# Altium PCB 24V-70A-Power-Board-v2.0.PcbDoc (part 7 of 9)
Units mm, origin at the board's own origin, x right, y up, seen from the top; angles counter-clockwise.
Board outline 350 x 215 mm, 2 copper layers (Top Layer, Bottom Layer), stack 1.64 mm thick; 337 components, 182 nets, 856 pads, 561 vias.
Unrouted connection lines stored in the file: 58.
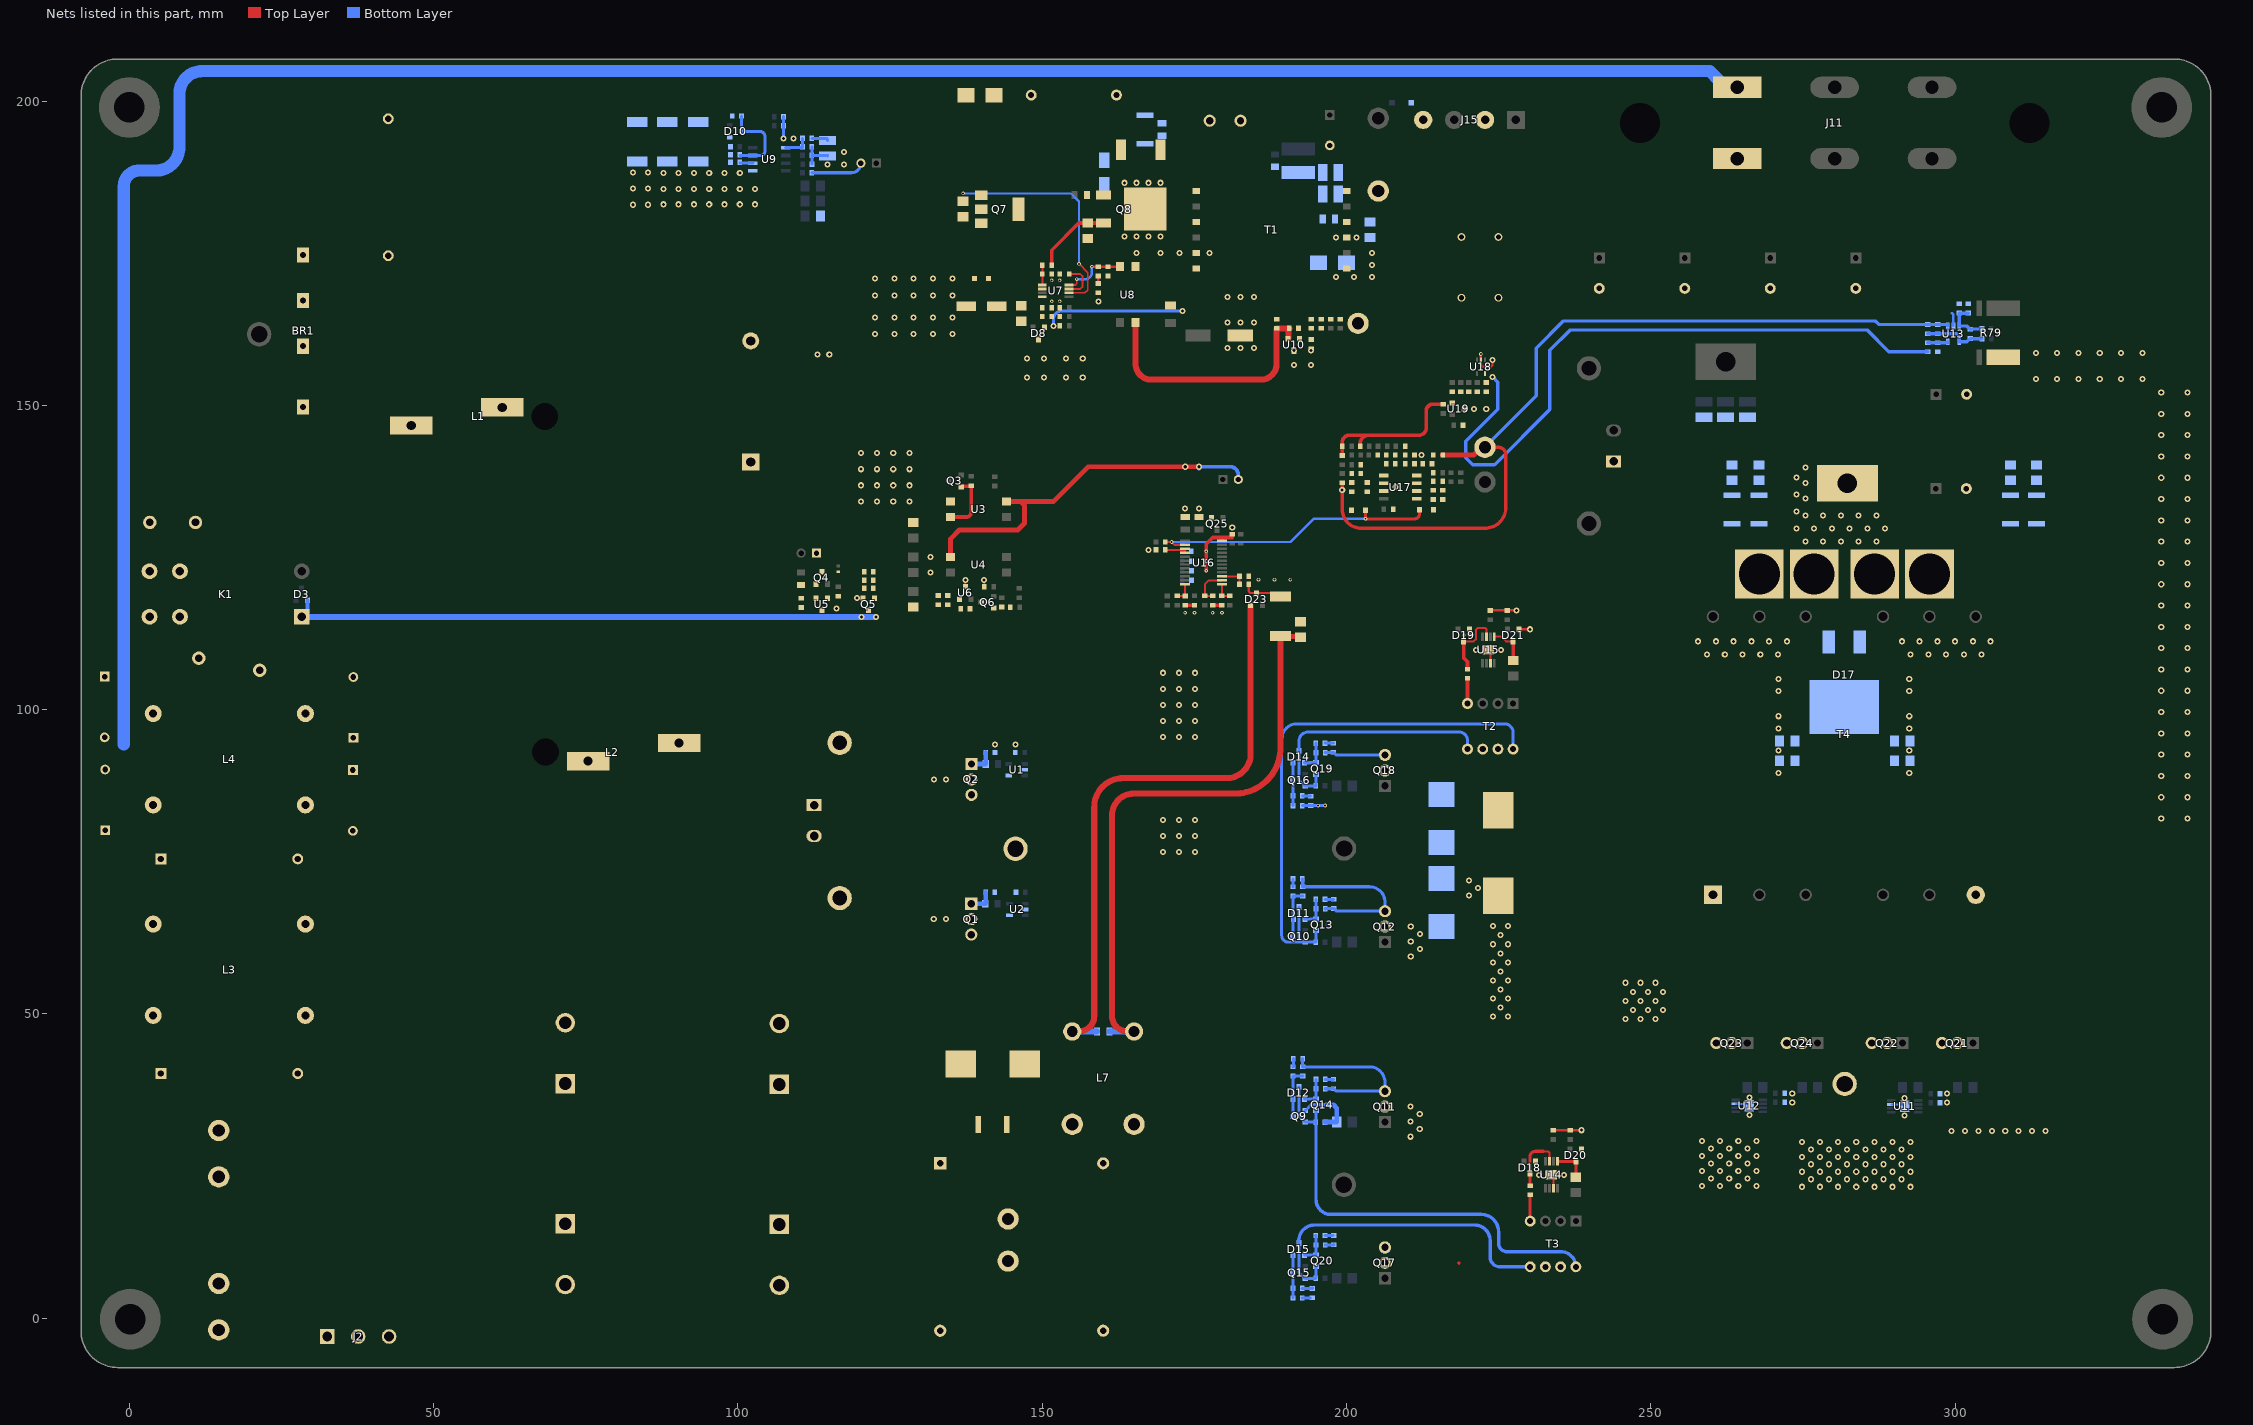
[diagram p2: the nets of this part, all layers, seen from the top]

## Via types
v1: diameter 1, hole 0.5, Top Layer to Bottom Layer, 506 vias
v2: diameter 0.6, hole 0.3, Top Layer to Bottom Layer, 35 vias
v3: diameter 1, hole 0.5, Top Layer to Bottom Layer, tented both sides, 16 vias
v4: diameter 0.6, hole 0.3, Top Layer to Bottom Layer, tented both sides, 4 vias

## Nets (pads, with @x,y where several pads share a name; then routed paths per layer and width w, separated by ;. In a path a pad name is that pad's centre, name@x,y a point inside that pad or via, vN(x,y) a via of type N, cw(c..) or ccw(c..) an arc to the next point about the centre after c; other vN are vias at no path point) (continued)
NetC32_2: (continued)
  Top Layer w0.3: U7.3@154.423,169.154 156.263,169.154 156.647,169.538 156.647,171.217 156.262,171.603 C32.2@154.423,171.603
NetC33_2: C33.2 R45.2 U7.4 U8.4 | length 10.8
  Top Layer w0.3: U7.4@154.423,169.804 155.464,169.804 155.689,170.029 v2(155.689,170.755)
  Top Layer w0.4: v2(158.166,172.803) R45.2@159.233,172.803 C33.2@160.807,172.803 U8.4@162.794,172.803
  Bottom Layer w0.4: v2(155.689,170.755) 157.056,170.755 ccw(c157.056,171.865) 158.166,171.865 v2(158.166,172.803)
NetC36_2: C36.2 R45.1 | length 1.2
  Top Layer w0.4: C36.2@159.233,170.029 R45.1@159.233,171.279
NetC37_2: C37.2 C38.1
NetC39_2: C39.2 L6.2 L7.2 R49.2
NetC40_1: C40.1 R50.2 | length 1.3
  Bottom Layer w0.5: C40.1@191.211,72.212 191.218,72.212 R50.2@191.218,70.907
NetC40_2: C40.2 C42.2 C44.2 C46.2 L8.1 Q12.3 Q18.2 T2.7 | length 27.7
  Bottom Layer w0.508: C40.2@192.735,72.212 cw(c192.735,72.13) 192.817,72.13 C42.2@192.817,70.907 203.791,70.907 cw(c203.791,68.367) 206.331,68.367 Q12.3@206.331,66.899 198.392,66.899 198.094,67.197 198.094,67.199 197.967,67.326 C46.2@197.904,67.326 ; C44.2@196.507,67.288 196.524,67.306 197.813,67.306 C46.2@197.831,67.323
NetC41_1: C41.1 R51.2 | length 1.4
  Bottom Layer w0.5: R51.2@191.218,41.324 ccw(c191.218,41.369) 191.262,41.369 C41.1@191.262,42.672
NetC41_2: C41.2 C43.2 C45.2 C47.2 Q11.3 Q17.2 T3.7 T4.6 | length 27.8
  Top Layer w0.508: 218.414,9.108 cw(c218.414,9.032) 218.491,9.032
  Bottom Layer w0.5: C43.2@192.811,41.369 C41.2@192.811,42.672 ; C43.2@192.817,41.324 203.778,41.324 cw(c203.778,38.784) 206.318,38.784 Q11.3@206.318,37.317 198.338,37.317 197.951,37.704 C47.2@197.951,37.729 ; C45.2@196.506,37.705 196.517,37.716 197.854,37.716 C47.2@197.865,37.727
NetC42_1: C42.1 D11.2 Q10.3 R50.1 | length 8.2
  Bottom Layer w0.5: Q10.3@191.218,62.769 R50.1@191.218,69.383 C42.1@192.817,69.383
NetC43_1: C43.1 D12.2 Q9.3 R51.1 | length 8.2
  Bottom Layer w0.5: Q9.3@191.218,33.187 R51.1@191.218,39.8 ; R51.1@191.218,39.8 C43.1@192.817,39.8
NetC44_1: C44.1 D11.1 Q13.2 R57.1 | length 5.1
  Bottom Layer w0.5: D11.1@193.123,65.619 Q13.2@194.996,65.619 194.977,65.639 194.977,68.83 R57.1@194.957,68.85
NetC45_1: C45.1 D12.1 Q14.2 R58.1 | length 5.1
  Bottom Layer w0.5: D12.1@193.109,36.037 Q14.2@194.982,36.037 ; R58.1@194.982,39.265 194.989,39.258 194.989,36.044 Q14.2@194.996,36.037
NetC46_1: C46.1 R57.2 | length 1.4
  Bottom Layer w0.5: R57.2@196.481,68.85 R57.2@196.481,68.85 197.83,68.849 C46.1@197.831,68.847
NetC47_1: C47.1 R58.2 | length 1.4
  Bottom Layer w0.5: R58.2@196.506,39.265 196.513,39.258 197.858,39.258 C47.1@197.865,39.251
NetC48_2: C48.2 T2.4 | length 4.1
  Top Layer w0.6: T2.4@219.892,101.023 C48.2@219.892,105.156
NetC49_2: C49.2 T3.4 | length 4.3
  Top Layer w0.508: T3.4@230.189,15.958 C49.2@230.189,20.269
NetC50_1: C50.1 R60.2 | length 1.4
  Bottom Layer w0.5: R60.2@192.742,85.845 C50.1@194.107,85.845
NetC51_1: C51.1 R61.2 | length 1.4
  Bottom Layer w0.5: R61.2@192.728,4.924 C51.1@194.093,4.924
  Bottom Layer w0.559: C51.1@194.371,4.924 cw(c194.371,4.887) C51.1@194.409,4.887
NetC52_1: C52.1 D14.2 Q16.3 R60.1 | length 7
  Bottom Layer w0.5: C52.1@191.218,84.245 R60.1@191.218,85.845 D14.2@191.218,91.283
NetC53_1: C53.1 D15.2 Q15.3 R61.1 | length 7
  Bottom Layer w0.5: R61.1@191.204,4.924 D15.2@191.204,10.363 ; C53.1@191.204,3.325 R61.1@191.204,4.924
NetC54_1: C54.1 D14.1 Q19.2 R66.1 | length 5.1
  Bottom Layer w0.5: D14.1@193.123,91.288 Q19.2@194.996,91.288 194.977,91.308 194.977,94.499 R66.1@194.957,94.519
NetC55_1: C55.1 D15.1 Q20.2 R67.1 | length 5.1
  Bottom Layer w0.5: D15.1@193.109,10.368 194.982,10.368 194.963,10.387 194.963,13.579 C55.1@194.944,13.598
NetC56_1: C56.1 R66.2 | length 1.4
  Bottom Layer w0.5: R66.2@196.481,94.519 R66.2@196.481,94.519 197.83,94.517 C56.1@197.831,94.516
NetC57_1: C57.1 R67.2 | length 1.4
  Bottom Layer w0.508: R67.2@196.493,12.036 196.511,12.054 197.799,12.054 C57.1@197.817,12.072 ; C57.1@197.866,12.036 ccw(c197.866,12.074) C57.1@197.904,12.074
NetC71_2: C71.2 R69.1
NetC72_2: C72.2 R70.1
NetC73_2: C73.2 C74.2 C75.2 C76.2 D17.3 R68.1
  other v1: 271.018,103.048 292.482,103.048 271.018,105.08 292.482,105.08
NetC77_2: C77.2 R71.1
NetC78_2: C78.2 R72.1
NetC79_2: C79.2 C84.2 R77.1 R78.2 U13.3 | length 7.6
  Bottom Layer w0.559: C79.2@302.17,165.182 R77.1@300.707,165.182 300.699,165.174 300.699,163.06 U13.3@300.692,163.052 301.934,163.052 302.472,162.514 C84.2@302.536,162.514 302.586,162.565 304.39,162.565 R78.2@304.441,162.616
NetC84_1: C84.1 C86.2 R80.2 R82.1 U13.4 | length 10.2
  Bottom Layer w0.559: R82.1@295.504,161.782 C86.2@297.148,161.782 300.074,161.782 cw(c300.074,161.157) 300.699,161.157 300.699,160.723 U13.4@300.692,160.452 301.934,160.452 302.472,160.99 C84.1@302.536,160.99 R80.2@304.441,160.99
NetC85_1: C85.1 R81.2 U13.5 | length 3.4
  Bottom Layer w0.559: R81.2@295.504,160.325 298.771,160.325 298.792,160.346 U13.5@298.792,160.452
NetC87_1: C87.1 C90.2 D22.1 U17.1
NetC87_2: C87.2 R84.2 R85.1 R90.1 R96.2 U17.2
NetC90_1: C90.1 R84.1
NetC93_2: C93.2 U16.3 U16.4 | length 4
  Top Layer w0.35: C93.2@170.214,126.263 173.366,126.263 173.491,126.138 ; U16.4@173.491,125.813 173.491,126.138 ; U16.3@173.491,126.463 173.491,126.263 173.491,126.138
NetC94_2: C94.2 R101.1 U16.15 | length 4.2
  Top Layer w0.35: U16.15@179.536,121.913 C94.2@182.419,121.913 R101.1@182.419,120.613
NetC95_2: C95.2 R108.1 R109.2 U17.3
NetC96_1: C96.1 C97.1 D24.1 U17.7
NetC96_2: C96.2 R110.2 R111.1 U17.6
NetC97_2: C97.2 R110.1
NetC102_2: C102.2 R117.1 R120.2 U17.5
NetC103_2: C103.2 R42.1 U7.5 | length 3.2
  Top Layer w0.34: U7.5@150.023,169.804 150.025,169.806 R42.1@150.025,173.038
NetD2_2: D2.2 L2.1 Q1.2 Q2.2
  other v1: 132.182,65.586 134.188,65.586 132.207,88.548 134.214,88.548
NetD3_1: D3.1 K1.1 Q5.3 | length 97.7
  Bottom Layer w0.6: K1.1@28.325,115.221 ccw(c28.325,116.171) 28.609,115.264 ccw(c28.325,116.171) K1.1@29.275,116.171
  Bottom Layer w0.7: K1.1@29.275,116.171 D3.1@29.275,117.967
  Bottom Layer w1: K1.1@28.312,115.264 28.609,115.264 v1(120.286,115.264) v1(122.704,115.264)
NetD4_2: D4.2 R22.2
NetD5_1: D5.1 R25.1 T1.1 T1.3
  other v1: 198.258,171.094 201.232,171.094 204.205,171.094 204.205,173.078 204.205,175.062 198.258,177.602 201.625,177.602
NetD6_2: D6.2 Q8.2 T1.9
  other v1: 163.509,177.786 165.481,177.786 167.453,177.786 169.426,177.786 163.509,186.588 165.481,186.588 167.453,186.588 169.426,186.588
NetD7_2: D7.2 D8.1 R33.2 T1.12 | length 23.1
  Bottom Layer w0.5: v1(151.875,163.061) 151.875,164.227 cw(c153.155,164.227) 153.155,165.506 v1(173.076,165.506)
NetD11_3: D11.3 Q10.2 Q13.1 R52.1 T2.8 | length 89.5
  Bottom Layer w0.5: D11.3@192.209,67.583 192.209,62.368 ccw(c192.758,62.368) 192.758,61.819 ; Q13.1@194.996,63.719 194.977,63.7 194.977,61.839 R52.1@194.957,61.819 192.758,61.819 ; T2.8@227.392,93.523 227.392,96.23 ccw(c225.933,96.23) 225.933,97.688 191.897,97.688 ccw(c191.897,95.148) 189.357,95.148 189.357,62.89 ccw(c190.428,62.89) 190.428,61.819 192.758,61.819
NetD12_3: D12.3 Q9.2 Q14.1 R55.1 T3.8 | length 72.5
  Bottom Layer w0.33: Q14.1@194.957,34.098 cw(c194.996,34.098) Q14.1@194.996,34.137
  Bottom Layer w0.5: D12.3@192.159,38.037 192.195,38.001 192.195,33.196 193.154,32.237 Q9.2@193.218,32.237 194.944,32.237 R55.1@194.963,32.256
  Bottom Layer w0.559: Q14.1@194.996,34.137 194.996,19.532 ccw(c197.459,19.532) 197.459,17.069 222.144,17.069 cw(c222.144,14.219) 224.993,14.219 224.993,12.344 ccw(c226.39,12.344) 226.39,10.947 235.2,10.947 cw(c235.2,8.458) T3.8@237.689,8.458
NetD13_1: D13.1 L7.3 Q11.2 Q12.2
  other v1: 210.553,29.834 212.039,31.07 210.553,32.306 212.039,33.541 210.553,34.777 210.566,59.417 212.053,60.653 210.566,61.888 212.053,63.124 210.566,64.359
NetD13_2: D13.2 D16.1 L8.2 T4.1
  other v1: 245.856,49.186 248.327,49.186 250.798,49.186 224.052,49.567 226.523,49.567 247.091,50.673 249.562,50.673 252.034,50.673 225.287,51.054 245.856,52.16 248.327,52.16 250.798,52.16 224.052,52.541 226.523,52.541 247.091,53.646 249.562,53.646 252.034,53.646 225.287,54.027 245.856,55.133 248.327,55.133 250.798,55.133 224.052,55.514 226.523,55.514 225.287,57.001 224.052,58.487 226.523,58.487 225.287,59.974 224.052,61.46 226.523,61.46 225.287,62.947 224.052,64.434 226.523,64.434 220.103,69.478 221.59,70.714 220.103,71.949
NetD14_3: D14.3 Q16.2 Q19.1 R62.1 T2.5 | length 42.2
  Bottom Layer w0.5: Q19.1@194.996,89.388 194.977,89.369 194.977,87.507 R62.1@194.957,87.488 193.168,87.488 192.209,88.447 192.209,94.876 cw(c193.675,94.876) 193.675,96.342 218.52,96.342 cw(c218.52,94.971) 219.892,94.971 T2.5@219.892,93.523
NetD15_3: D15.3 Q15.2 Q20.1 R65.1 T3.5 | length 54.9
  Bottom Layer w0.5: D15.3@192.159,12.368 192.195,12.332 192.195,7.527 193.154,6.568 194.944,6.568 194.963,6.587 194.963,8.449 Q20.1@194.982,8.468
  Bottom Layer w0.559: D15.3@192.187,12.372 cw(c194.766,12.722) 194.766,15.324 221.056,15.324 cw(c221.056,12.784) 223.596,12.784 223.596,10.084 ccw(c225.222,10.084) 225.222,8.458 T3.5@230.189,8.458
NetD17_1: D17.1 Q23.2 Q24.2 R71.2 R72.2 T4.16
  other v1: 259.248,109.093 262.165,109.093 265.082,109.093 267.998,109.093 270.915,109.093 257.79,111.248 260.707,111.248 263.623,111.248 266.54,111.248 269.456,111.248 272.373,111.248
NetD17_2: D17.2 Q21.2 Q22.2 R69.2 R70.2 T4.13
  other v1: 292.716,109.093 295.633,109.093 298.55,109.093 301.466,109.093 304.383,109.093 291.258,111.248 294.175,111.248 297.091,111.248 300.008,111.248 302.925,111.248 305.841,111.248
NetD23_3: D23.3 R101.2 R102.1 | length 7.7
  Top Layer w0.35: R101.2@183.943,120.613 183.943,119.565 ccw(c184.35,119.565) 184.35,119.159 D23.3@185.213,119.159 R102.1@188.611,119.159 ; R102.1@188.611,119.159 cw(c188.611,118.616) R102.1@189.154,118.616 ccw(c188.611,118.616) R102.1@188.611,119.159
NetD25_2: D25.2 J15.4
NetJ8_2: J8.2 R34.2 | length 9
  Bottom Layer w0.508: R34.2@112.141,188.244 118.651,188.244 ccw(c118.651,189.814) J8.2@120.221,189.814
NetJ9_1: J9.1 R31.1 R38.2 R40.2
NetL1_2: L1.2 L2.2
NetL9_1: L9.1 T4.14 T4.15
  other v1: 275.397,127.639 278.314,127.639 281.23,127.639 284.147,127.639 287.064,127.639 273.939,129.794 276.856,129.794 279.772,129.794 282.689,129.794 285.605,129.794 288.522,129.794 275.397,131.949 278.314,131.949 281.23,131.949 284.147,131.949 287.064,131.949 273.939,132.579 275.397,134.734 273.939,135.364 275.397,137.265 273.939,138.15 275.397,139.796
NetQ1_1: Q1.1 R2.2 R4.2 | length 4.2
  Bottom Layer w0.76: Q1.1@138.349,68.126 R2.2@140.686,68.126 ; R2.2@140.701,68.141 R4.2@140.701,70.006
NetQ2_1: Q2.1 R1.2 R3.2 | length 4.2
  Bottom Layer w0.76: Q2.1@138.374,91.088 R1.2@140.711,91.088 ; R1.2@140.726,91.103 R3.2@140.726,92.967
NetQ3_1: Q3.1 R11.1 U3.4 | length 9.8
  Top Layer w0.6: U3.4@134.953,131.666 137.583,131.666 ccw(c137.583,132.401) 138.318,132.401 138.318,136.762 138.272,136.715 136.745,136.715 Q3.1@136.667,136.637
NetQ4_1: Q4.1 R13.1 U5.1
NetQ6_1: Q6.1 R9.1 R16.2
NetQ6_3: Q6.3 R19.2
NetQ7_1: Q7.1 R35.1 U7.2 | length 38.1
  Top Layer w0.3: v2@136.915,184.758 v2(137.006,184.848) ; U7.2@154.423,168.504 157.026,168.504 157.482,168.961 157.482,171.835 v2(156.058,173.26)
  Bottom Layer w0.35: v2(137.006,184.848) 154.711,184.848 156.058,183.502 v2(156.058,173.26)
NetQ7_2: Q7.2 Q7.4 R23.1
NetQ8_1: Q8.1 R41.2
NetQ8_3: Q8.3 R42.2 R46.2 | length 11.7
  Top Layer w0.6: R42.2@151.549,173.038 151.549,175.519 156.005,179.976 Q8.3@158.95,179.976
NetQ9_1: Q9.1 Q14.3 R54.1 R55.2 | length 10.1
  Bottom Layer w0.5: Q9.1@193.204,34.137 193.254,34.137 194.204,35.087 Q14.3@196.982,35.087
  Bottom Layer w0.8: R55.2@196.468,32.237 198.411,32.237 198.411,34.527 197.862,35.077 196.992,35.077 Q14.3@196.982,35.087